# Altium PCB Car_Circuitry.PcbDoc
Units mm, origin at the board's own origin, x right, y up, seen from the top; angles counter-clockwise.
Board outline 92.11 x 67.11 mm, 4 copper layers (Top Signal, GND Plane, PWR Plane, Bottom Signal), stack 1.541 mm thick; 56 components, 49 nets, 197 pads, 46 vias.
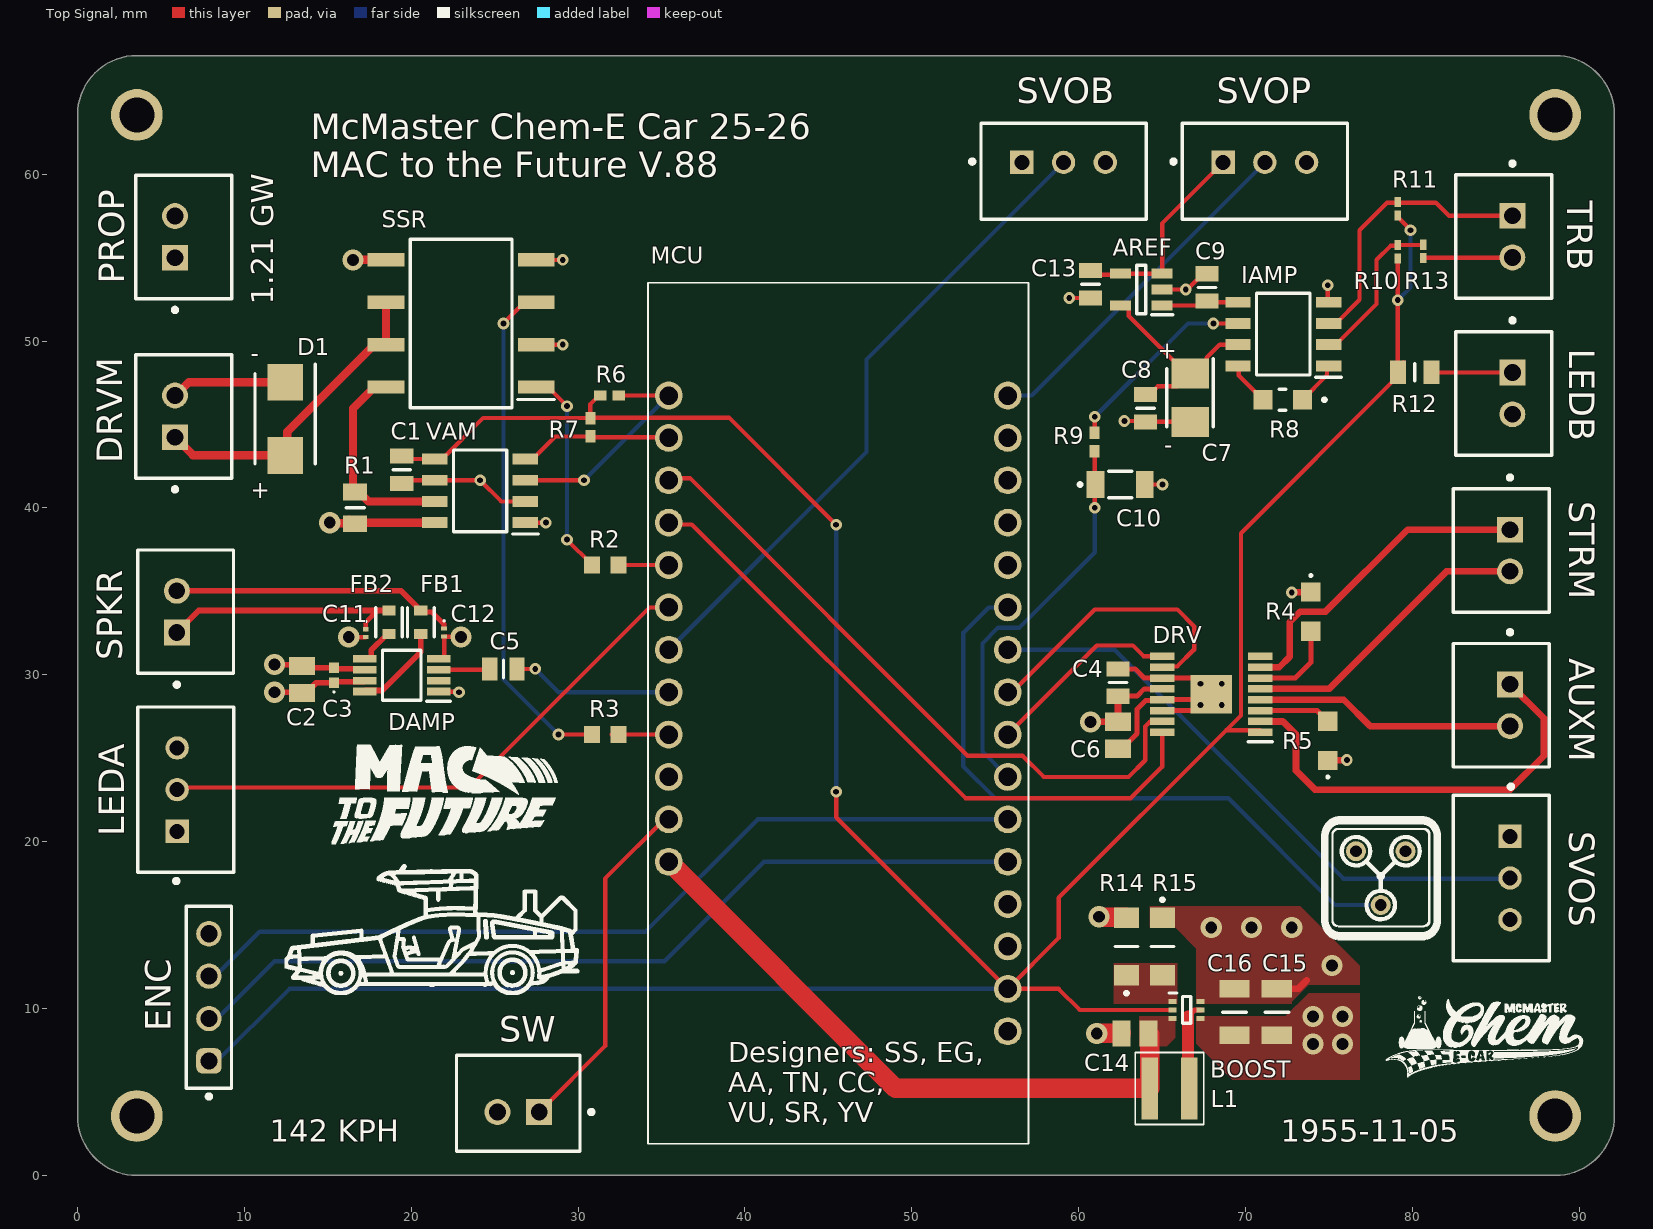
[diagram p0: Top Signal view]
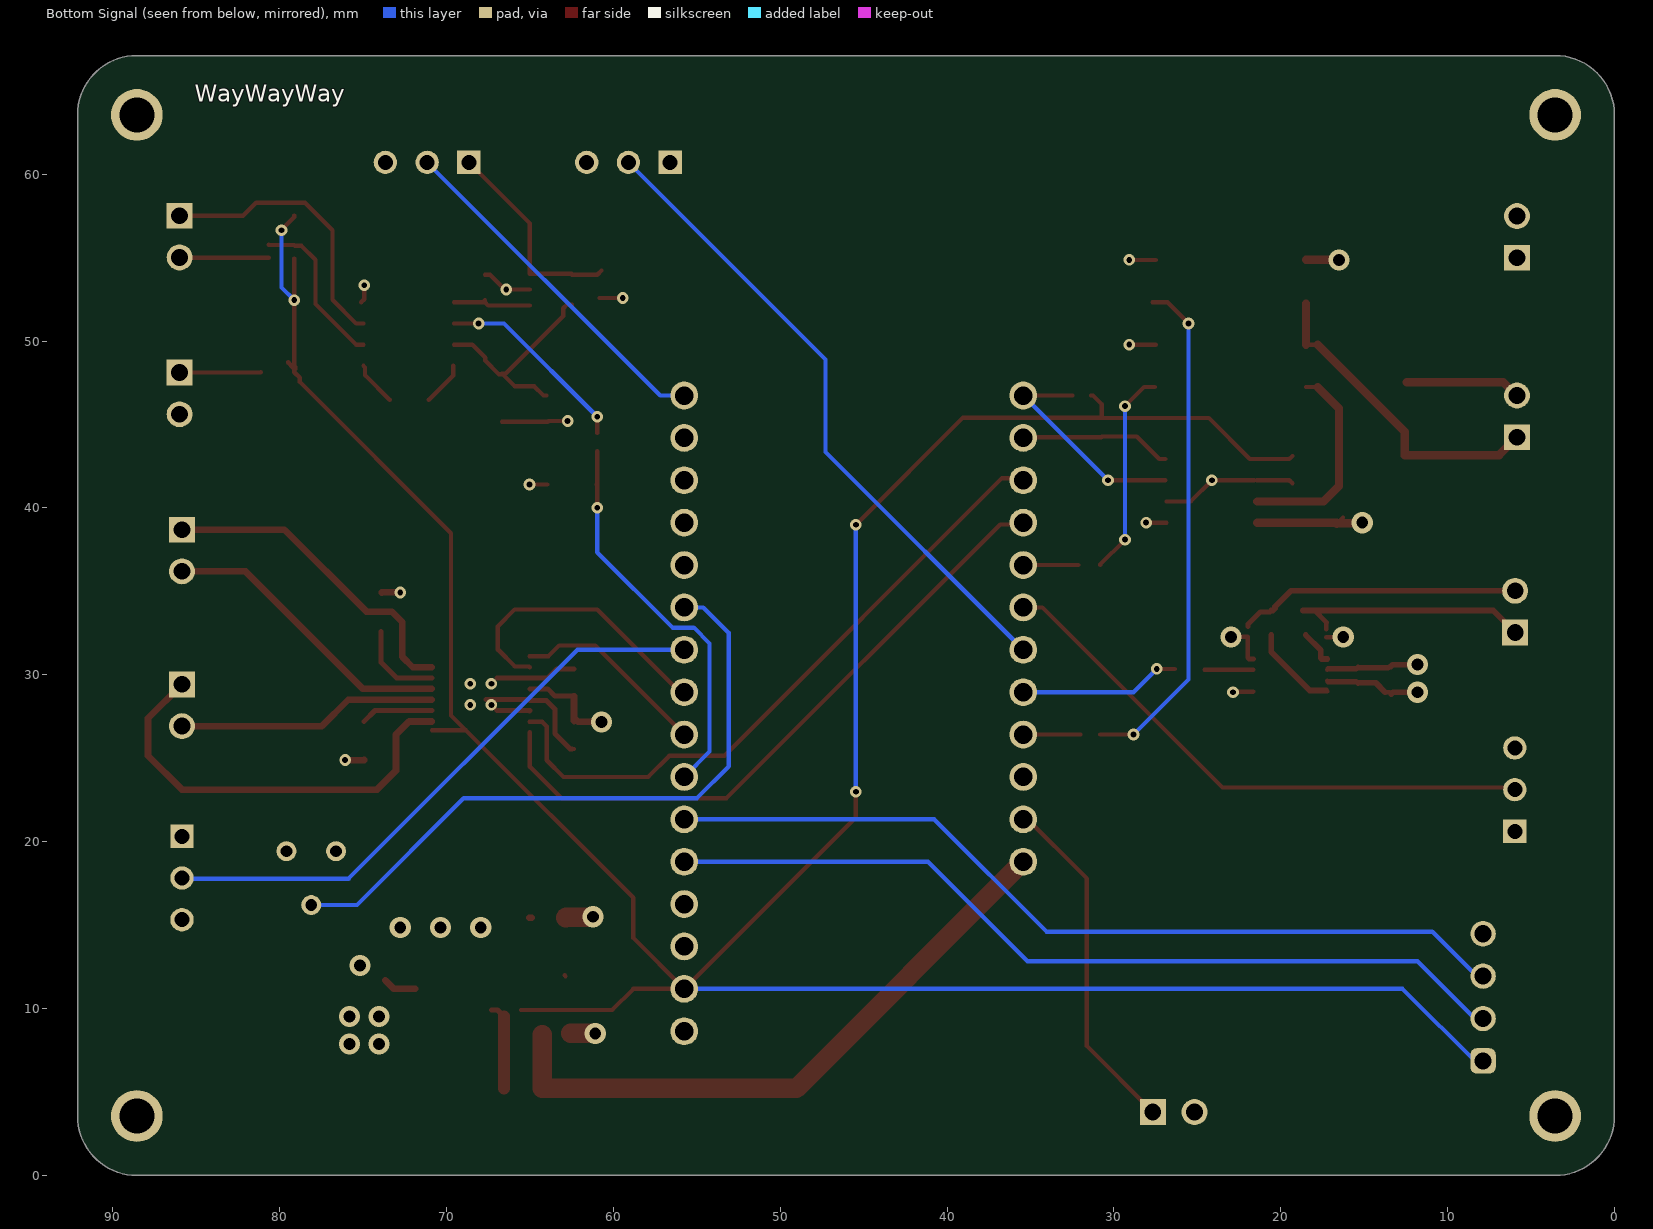
[diagram p1: Bottom Signal view, seen from below]
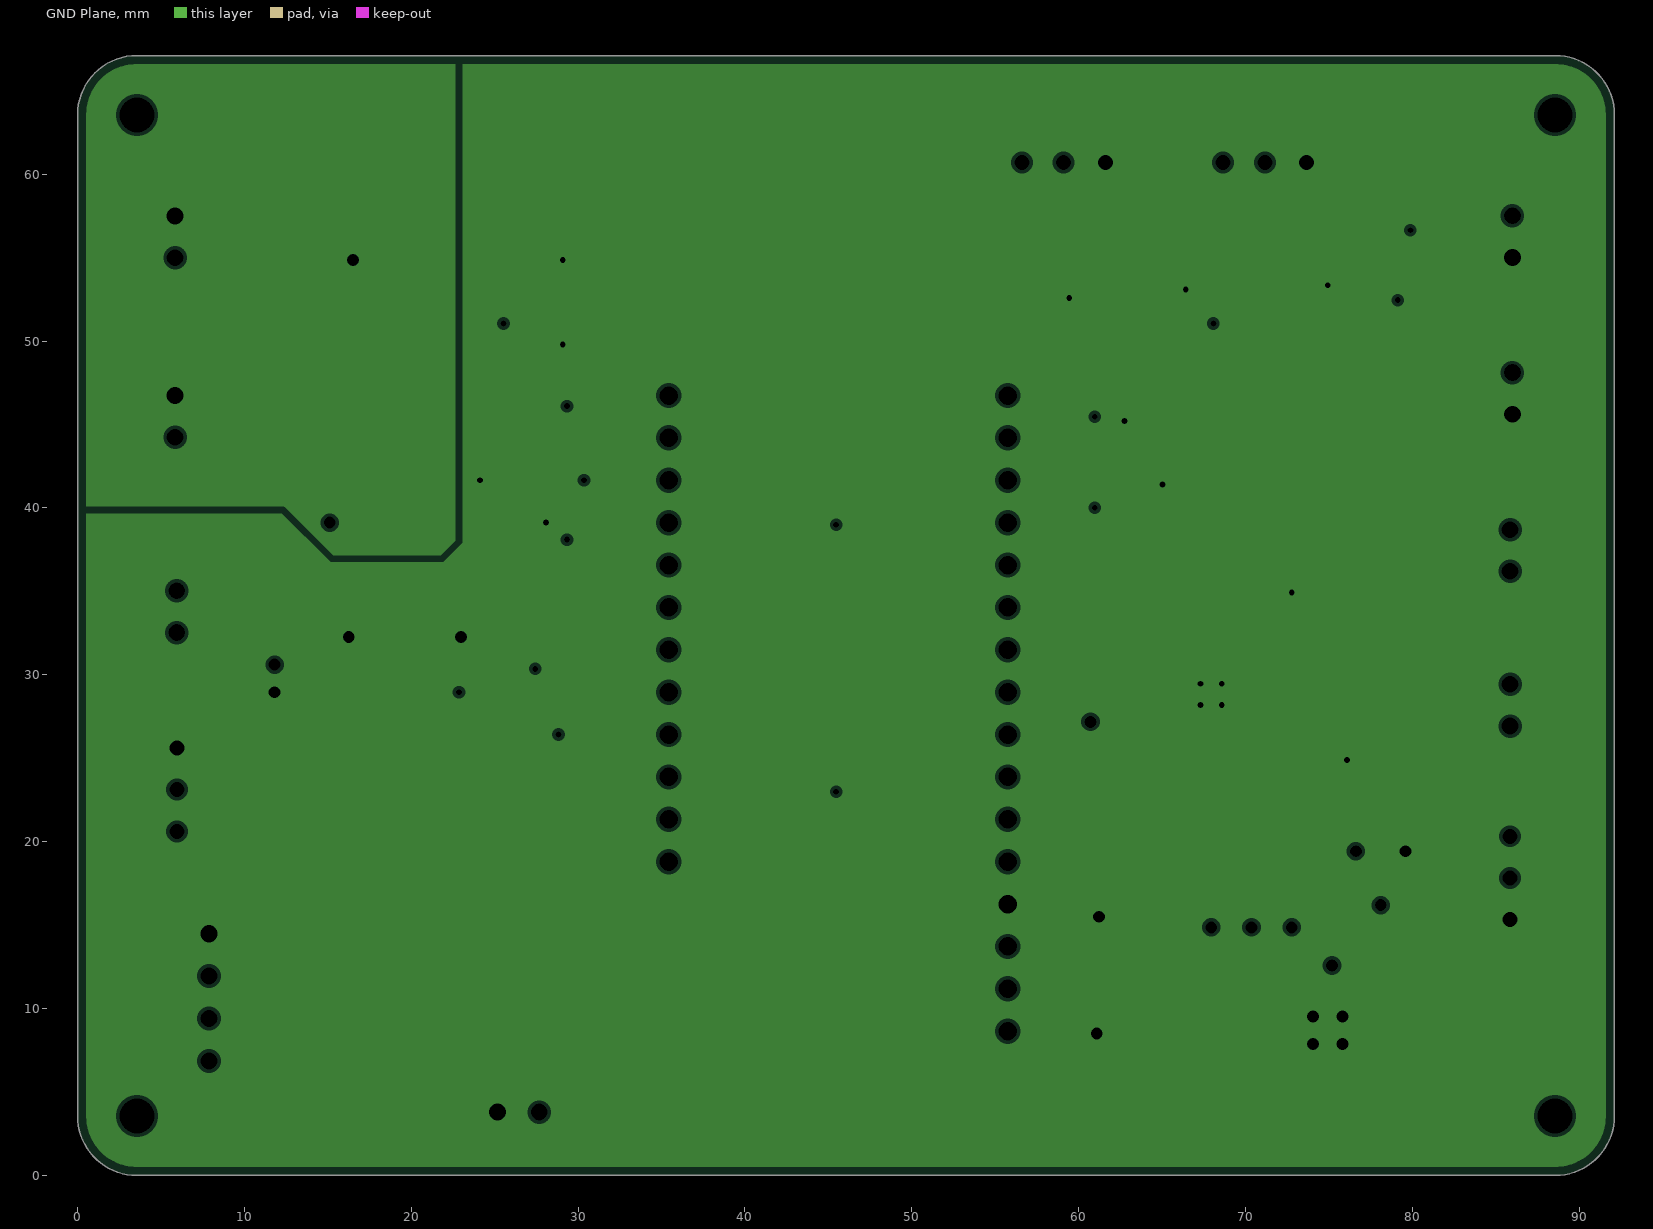
[diagram p2: GND Plane, clearances drawn from the general rule]
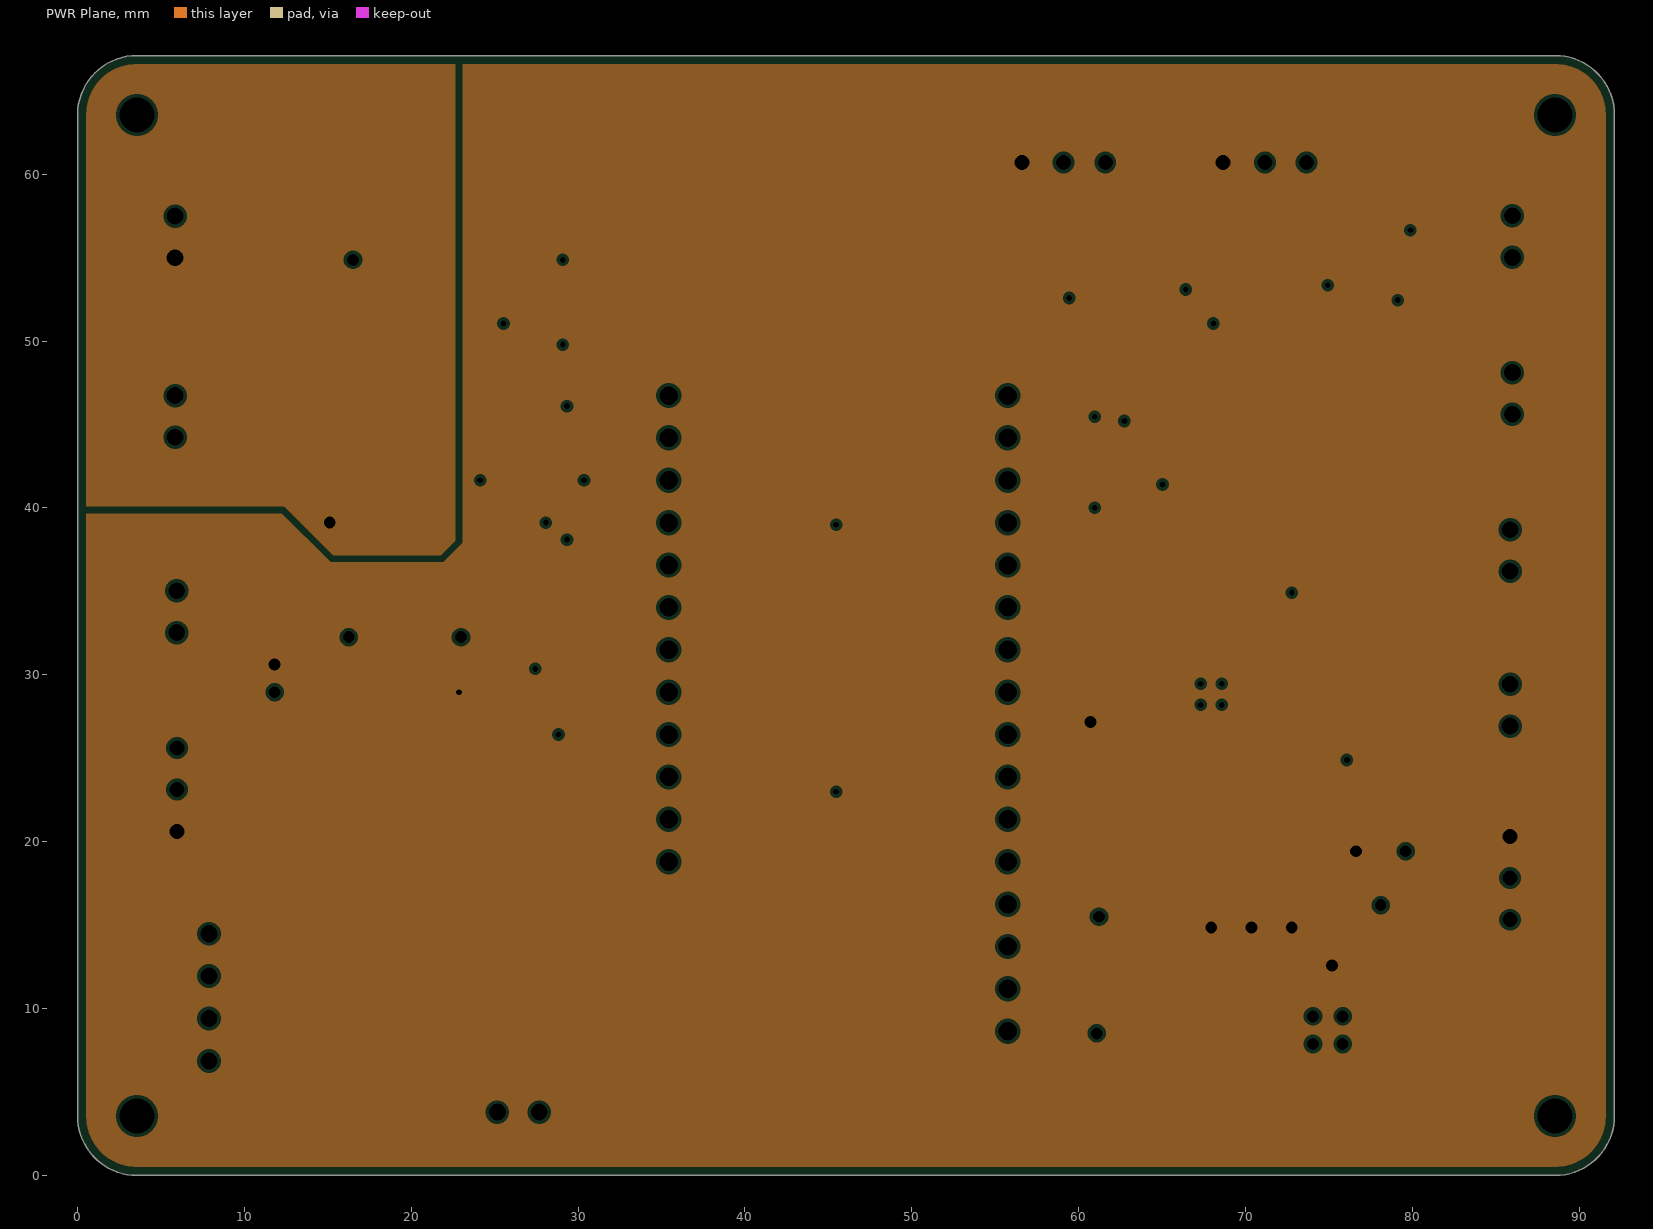
[diagram p3: PWR Plane, clearances drawn from the general rule]
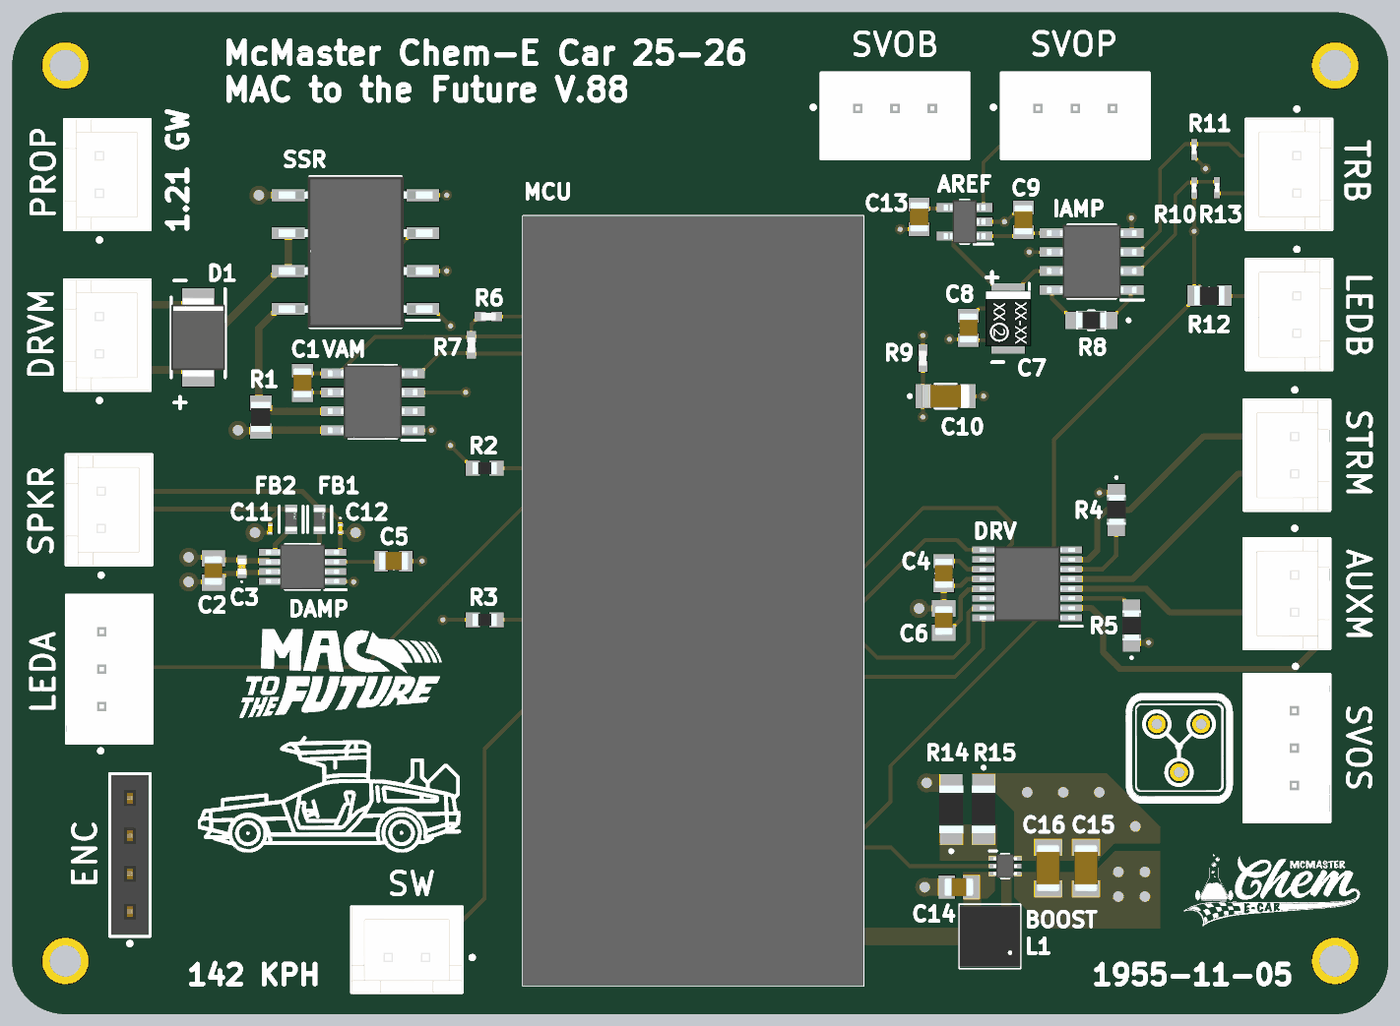
[diagram p4: 3D render of the assembled board from above, using the file's embedded part models]

## Layer stack, top to bottom
Top Solder: solder mask 0.0254, SM-002, Dk 4
Top Signal: signal copper 0.035
Dielectric 2: prepreg 0.1855, PP-021, Dk 4.74
GND Plane: plane copper 0.035, net (Multiple Nets)
Dielectric 1: core 1.03, Core-042, Dk 4.6
PWR Plane: plane copper 0.035, net (Multiple Nets)
Dielectric 3: prepreg 0.1855, PP-021, Dk 4.74
Bottom Signal: signal copper 0.035
Bottom Solder: solder mask 0.0254, SM-002, Dk 4

## Board outline
3.556,0 cw(c3.556,3.556) 0,3.556 0,63.556 cw(c3.556,63.556) 3.556,67.112 88.556,67.112 cw(c88.556,63.556) 92.112,63.556 92.112,3.556 cw(c88.556,3.556) 88.556,0

## Design rules (kind name [scope] priority, off if disabled: settings)
BoardOutlineClearance [All] p1: gap=0.2 ignorepadtopadclearanceinfootprint=FALSE
Clearance [All] p1: gap=0.102 ignorepadtopadclearanceinfootprint=TRUE except(0.127: Arc-Via Track-Via SMDPad-Via THPad-Via Via-Via Via-Fill Via-Poly Via-Region Via-Text; 0.254: Arc-Hole Track-Hole SMDPad-Hole THPad-Hole Via-Hole Fill-Hole Poly-Hole Region-Hole Text-Hole)
ComponentClearance [All] p1: gap=0.102 collisioncheckmode=3 verticalgap=0.102 showdistances=TRUE
DiffPairsRouting [All] p1: maxlimit=0.102 minlimit=0.102 mostfreqgap=0.102 toplayer_minwidth=0.102 toplayer_maxwidth=1816.048 toplayer_prefwidth=0.102 bottomlayer_minwidth=0.102 bottomlayer_maxwidth=1816.048 bottomlayer_prefwidth=0.102 maxuncoupledlength=12.7
Height [All] p1: minheight=0 maxheight=1816.048 prefheight=12.7
HoleSize [All] p1: absolutevalues=TRUE maxlimit=6.3 minlimit=0.2 maxpercent=80.000 minpercent=20.000
HoleToHoleClearance [All] p1: gap=0.254 allowstackedmicrovias=FALSE
MinimumAnnularRing [All] p1: minimumring=0.152
MinimumSolderMaskSliver [All] p1: minsoldermaskwidth=0.09
PlaneClearance [All] p1: clearance=0.204
PlaneConnect PlaneConnectPowerPads [InPadClass('PowerPads')] p1: planeconnectstyle=Direct reliefexpansion=0.508 reliefentries=4 reliefconductorwidth=0.254 reliefairgap=0.254
PlaneConnect [All] p2: pad.planeconnectstyle=Relief pad.reliefexpansion=0.3 pad.reliefentries=4 pad.reliefconductorwidth=0.204 pad.reliefairgap=0.204 via.planeconnectstyle=Direct via.reliefexpansion=0.3 via.reliefentries=4 via.reliefconductorwidth=0.127 via.reliefairgap=0.127
PolygonConnect PolygonConnectPowerPads [All vs (InPadClass('PowerPads'))] p1: connectstyle=Direct reliefconductorwidth=0.254 reliefentries=4 polygonreliefangle="90 Angle" airgapwidth=0.254
PolygonConnect [All] p2: thpad.connectstyle=Relief thpad.reliefconductorwidth=0.204 thpad.reliefentries=4 thpad.polygonreliefangle="90 Angle" thpad.airgapwidth=0.204 smdpad.connectstyle=Direct smdpad.reliefconductorwidth=0.102 smdpad.reliefentries=4 smdpad.polygonreliefangle="90 Angle" smdpad.airgapwidth=0.102 via.connectstyle=Direct via.reliefconductorwidth=0.127 via.reliefentries=4 via.polygonreliefangle="90 Angle" via.airgapwidth=0.127
RoutingVias [All] p1: holewidth=0.2 width=0.45 viastyle="Through Hole" minholewidth=0.2 minwidth=0.45 maxholewidth=6.3 maxwidth=6.55
SilkToSilkClearance [All] p1: silktosilkclearance=0.127
SilkToSolderMaskClearance [IsPad] p1: minsilkscreentomaskgap=0.127 clearancetoexposedcopper=TRUE
SolderMaskExpansion [All] p1: expansion=0.051 istentingtop=FALSE
SupplyNets "Schematic Supply Nets" [InNet('GND')] p1: voltage=0.000
UnRoutedNet [All] p1: checkbadconnections=TRUE
Width Width_4mil [All] p1: maxlimit=25.4 minlimit=0.102 preferedwidth=0.254 minimp=50.000000 maximp=50.000000 favimp=50.000000
19 further rules are at their usual default settings.

## Components (designator, comment, footprint, x,y, rotation, side; value= is the part's Value field where it differs from the comment)
AREF "REF2033QDDCRQ1" SOT95P280X110-5N 63.754,53.086 r180 top
AUXM "B2B-XH-A(LF)(SN)" FP-B2B-XH-A_LF_SN-MFG 85.327,28.174 r270 top
BOOST "TPS61023DRLT" SOTFL50P160X60-6N 66.472,9.914 r0 top
C1 "100 nF" CAPC2012X95N 19.431,42.291 r270 top
C2 "10 μF" CAPC2012X140N 13.462,29.718 r90 top
C3 "1 μF" C0402C104J4RACTU 15.367,29.972 r90 top
C4 "100 nF" CAPC2012X95N 62.357,29.533 r270 top
C5 "100 nF" CAPC2012X95N 25.527,30.353 r180 top
C6 "10 μF" CAPC2012X140N 62.357,26.368 r270 top
C7 "10 μF" CAPPM3528X210N 66.675,46.609 r270 top
C8 "100 nF" CAPC2012X95N 64.008,45.974 r270 top
C9 "100 nF" CAPC2012X95N 67.691,53.213 r90 top
C10 "100 μF" GRM31x 62.484,41.402 r0 top
C11 "220 pF" GRM033D70J224ME01D 17.272,32.495 r270 top
C12 "220 pF" GRM033D70J224ME01D 21.971,32.529 r270 top
C13 "100 nF" CAPC2012X95N 60.706,53.409 r270 top
C14 "10 μF" CAPC2012X140N 63.373,8.509 r0 top
C15 "22 μF" CAPC3216X180N 71.882,9.779 r90 top
C16 "22 μF" CAPC3216X180N 69.342,9.779 r90 top
D1 "SMBJ18CA" DIOM5436X261N 12.446,45.339 r270 top
DAMP "PAM8302AASCR" SOP65P490X110-8N 19.431,29.972 r180 top
DRV "DRV8847PWPR" SOP65P640X120-17N 67.945,28.829 r180 top
DRVM "B2B-XH-A(LF)(SN)" FP-B2B-XH-A_LF_SN-MFG 6.367,45.486 r90 top
ENC "61300411821" 61300411821 7.874,10.668 r90 top
FB1 "MPZ1608S221ATA00" FP-MPZ1608-0_8-MFG 20.574,33.147 r90 top
FB2 "MPZ1608S221ATA00" FP-MPZ1608-0_8-MFG 18.669,33.147 r90 top
IAMP "AD623ARZ-R7" SOIC127P600X175-8N 72.263,50.419 r180 top
L1 "1 μH" 74438357010 65.447,5.207 r180 top
LEDA "B3B-XH-A(LF)(SN)" FP-B3B-XH-A_LF_SN-MFG 6.494,23.114 r90 top
LEDB "B2B-XH-A(LF)(SN)" FP-B2B-XH-A_LF_SN-MFG 85.471,46.863 r270 top
MCU "Feather RP2040 Adalogger" 2796 55.753,8.636 r90 top
PROP "B2B-XH-A(LF)(SN)" FP-B2B-XH-A_LF_SN-MFG 6.367,56.241 r90 top
R1 "100 mΩ" RESC2013X65N 16.637,40.005 r90 top
R2 "400 Ω" RESC1608X46N 31.623,36.576 r180 top
R3 "400 Ω" RESC1608X46N 31.623,26.416 r180 top
R4 "680 mΩ" ERJ6_B_BW_R_LW_CW_D 73.914,33.782 r270 top
R5 "680 mΩ" ERJ6_B_BW_R_LW_CW_D 74.93,26.035 r90 top
R6 "10 kΩ" RESC1005X40N 31.877,46.736 r0 top
R7 "10 kΩ" RESC1005X40N 30.734,44.831 r270 top
R8 "200 kΩ" ERA6AEB101V 72.231,46.482 r180 top
R9 "330 Ω" RESC1005X40N 60.96,43.942 r270 top
R10 "5 kΩ" RESC0603X26N 79.121,55.353 r270 top
R11 "5 kΩ" RESC0603X26N 79.121,57.931 r270 top
R12 "150 Ω" RESC2012X60N 80.137,48.133 r180 top
R13 "5 kΩ" RESC0603X26N 80.645,55.372 r90 top
R14 "100 kΩ" ERJ8ENF1000V 62.865,13.716 r90 top
R15 "732 kΩ" ERJ8ENF1000V 65.024,13.716 r270 top
SPKR "B2B-XH-A(LF)(SN)" FP-B2B-XH-A_LF_SN-MFG 6.477,33.782 r90 top
SSR "CS326" SOP254P1030X390-8N 22.987,51.054 r180 top
STRM "B2B-XH-A(LF)(SN)" FP-B2B-XH-A_LF_SN-MFG 85.327,37.445 r270 top
SVOB "B3B-XH-A(LF)(SN)" FP-B3B-XH-A_LF_SN-MFG 59.095,60.181 r0 top
SVOP "B3B-XH-A(LF)(SN)" FP-B3B-XH-A_LF_SN-MFG 71.16,60.181 r0 top
SVOS "B3B-XH-A(LF)(SN)" FP-B3B-XH-A_LF_SN-MFG 85.327,17.82 r270 top
SW "B2B-XH-A(LF)(SN)" FP-B2B-XH-A_LF_SN-MFG 26.416,4.318 r180 top
TRB "B2B-XH-A(LF)(SN)" FP-B2B-XH-A_LF_SN-MFG 85.471,56.261 r270 top
VAM "INA219BIDR" SOIC127P600X175-8N 24.13,41.021 r180 top

## Footprints (in the part's own frame and the unit in brackets; to place one, negate y for a bottom-side part, rotate by r counter-clockwise, add the part's x,y. Pads: shape width x height; smd on the part's side, far side on the other; paste and mask are expansions set on the pad)
2796 [mm]
  round 1.665 hole 1.11: 1(10.16,20.32) 2(12.7,20.32) 3(15.24,20.32) 4(17.78,20.32) 5(20.32,20.32) 6(22.86,20.32) 7(25.4,20.32) 8(27.94,20.32) 9(30.48,20.32) 10(33.02,20.32) 11(35.56,20.32) 12(38.1,20.32) 13(38.1,0) 14(35.56,0) 15(33.02,0) 16(30.48,0) 17(27.94,0) 18(25.4,0) 19(22.86,0) 20(20.32,0) 21(17.78,0) 22(15.24,0) 23(12.7,0) 24(10.16,0) 25(7.62,0) 26(5.08,0) 27(2.54,0) 28(0,0)
  silkscreen extent -6.75,-1.24 44.85,21.56, body extent -6.75,-1.24 44.85,21.56, height 8.1
61300411821 [mm] "Socket Header, Pitch 2.54 mm, THT, Vertical, single row, 4p"
  rrect50% 1.52x1.52 hole 1.02: 1(-3.81,0)
  round 1.52 hole 1.02: 2(-1.27,0) 3(1.27,0) 4(3.81,0)
  silkscreen extent -6.06,-1.35 5.46,1.35, body extent -5.33,-1.25 5.33,1.25, height 8.55
74438357010 [mm]
  rect 0.98x3.7 smd: 1(-1.185,0) 2(1.185,0)
  silkscreen extent -2.05,-2.16 2.05,2.16, body extent -2.05,-2.05 2.05,2.05, height 3.1
C0402C104J4RACTU [mm]
  rect 0.62x0.62 smd: 1(-0.45,0) 2(0.45,0)
  silkscreen extent -1.05,-0.05 -0.95,0.05, body extent -0.52,-0.28 0.53,0.27, height 0.55
CAPC2012X95N [mm]
  rect 0.91x1.39 smd: 1(-0.82,0) 2(0.82,0)
  silkscreen extent 0,-0.53 0,0.53, body extent -1,-0.63 1,0.63, height 0.95
CAPC2012X140N [mm]
  rect 1.1x1.57 smd: 1(-0.81,0) 2(0.81,0)
  body extent -1,-0.63 1,0.63, height 1.4
CAPC3216X180N [mm]
  rect 1.05x1.82 smd: 1(-1.39,0) 2(1.39,0)
  silkscreen extent 0,-0.7 0,0.7, body extent -1.6,-0.8 1.6,0.8, height 1.8
CAPPM3528X210N [mm]
  rect 1.8x2.25 smd: 1(-1.45,0) 2(1.45,0)
  silkscreen extent -2.35,-1.4 1.75,1.4, body extent -1.86,-1.54 1.87,1.53, height 2.13
DIOM5436X261N [mm]
  rect 2.2x2.15 smd: 1(-2.2,0) 2(2.2,0)
  silkscreen extent -3.27,-1.81 2.7,1.81, body extent -2.7,-1.81 2.7,1.81, height 2.61
ERA6AEB101V [mm]
  rect 1.15x1.15 smd: 1(-1.175,0) 2(1.175,0)
  silkscreen extent -2.6,-0.63 0.2,0.63, body extent -1,-0.63 1,0.63, height 0.5
ERJ6_B_BW_R_LW_CW_D [mm]
  rect 1.15x1.15 smd: 1(-1.175,0) 2(1.175,0)
  silkscreen extent -2.21,-0.05 -2.11,0.05, body extent -1,-0.63 1,0.63, height 0.6
ERJ8ENF1000V [mm]
  rect 1.25x1.5 smd: 1(-1.725,0) 2(1.725,0)
  silkscreen extent -2.9,-0.67 0,0.67, body extent -1.6,-0.8 1.6,0.8, height 0.6
FP-B2B-XH-A_LF_SN-MFG [mm]
  rect 1.55x1.55 hole 1 paste-2539.97 mask+0: 1(-1.25,0.525)
  round 1.55 hole 1 paste-2539.97 mask+0: 2(1.25,0.525)
  silkscreen extent -4.5,-2.87 3.7,2.88, body extent -3.8,-2.98 3.8,2.98, height 0.25
FP-B3B-XH-A_LF_SN-MFG [mm]
  rect 1.4x1.4 hole 0.9 paste-2539.97 mask+0: 1(-2.5,0.525)
  round 1.4 hole 0.9 paste-2539.97 mask+0: 2(0,0.525) 3(2.5,0.525)
  silkscreen extent -5.6,-2.88 4.95,2.88, body extent -5.05,-2.98 5.05,2.98, height 0.25
FP-MPZ1608-0_8-MFG [mm]
  rect 0.6x0.8 smd paste+0 mask+0: 1(-0.7,0) 2(0.7,0)
  silkscreen extent -0.87,-0.8 0.87,0.8, body extent -1.1,-0.58 1.1,0.58, height 0.25
GRM31x [mm]
  rect 1.05x1.6 smd: 1(-1.475,0) 2(1.475,0)
  silkscreen extent -2.5,-0.8 0.7,0.8, body extent -1.6,-0.8 1.6,0.8, height 1
GRM033D70J224ME01D [mm]
  rect 0.25x0.35 smd: 1(-0.237,0) 2(0.237,0)
  silkscreen extent -0.75,-0.05 -0.65,0.05, body extent -0.3,-0.15 0.3,0.15, height 0.3
RESC0603X26N [mm]
  rect 0.6x0.4 smd: 1(-0.4,0) 2(0.4,0)
  body extent -0.31,-0.15 0.31,0.15, height 0.26
RESC1005X40N [mm]
  rect 0.75x0.6 smd: 1(-0.55,0) 2(0.55,0)
  body extent -0.5,-0.25 0.5,0.25, height 0.35
RESC1608X46N [mm]
  rect 0.95x1 smd: 1(-0.8,0) 2(0.8,0)
  body extent -0.81,-0.41 0.81,0.41, height 0.46
RESC2012X60N [mm]
  rect 0.95x1.4 smd: 1(-1,0) 2(1,0)
  silkscreen extent 0,-0.53 0,0.53, body extent -1,-0.63 1,0.63, height 0.6
RESC2013X65N [mm]
  rect 1x1.45 smd: 1(-0.95,0) 2(0.95,0)
  silkscreen extent 0,-0.55 0,0.55, body extent -1,-0.65 1,0.65, height 0.65
SOIC127P600X175-8N [mm]
  rect 1.525x0.65 smd: 1(-2.712,1.905) 2(-2.712,0.635) 3(-2.712,-0.635) 4(-2.712,-1.905) 5(2.712,-1.905) 6(2.712,-0.635) 7(2.712,0.635) 8(2.712,1.905)
  silkscreen extent -3.47,-2.45 1.6,2.58, body extent -3,-2.45 3,2.45, height 1.75
SOP65P490X110-8N [mm]
  rect 1.425x0.45 smd: 1(-2.212,0.975) 2(-2.212,0.325) 3(-2.212,-0.325) 4(-2.212,-0.975) 5(2.212,-0.975) 6(2.212,-0.325) 7(2.212,0.325) 8(2.212,0.975)
  silkscreen extent -2.93,-1.5 1.15,1.55, body extent -2.45,-1.5 2.45,1.5, height 1.1
SOP65P640X120-17N [mm]
  rect 1.475x0.45 smd: 1(-2.938,2.275) 2(-2.938,1.625) 3(-2.938,0.975) 4(-2.938,0.325) 5(-2.938,-0.325) 6(-2.938,-0.975) 7(-2.938,-1.625) 8(-2.938,-2.275) 9(2.938,-2.275) 10(2.938,-1.625) 11(2.938,-0.975) 12(2.938,-0.325) 13(2.938,0.325) 14(2.938,0.975) 15(2.938,1.625) 16(2.938,2.275)
  rect 2.46x2.31 smd: 17(0,0)
  silkscreen extent -3.67,2.85 -2.2,2.85, body extent -3.2,-2.5 3.2,2.5, height 1.2
SOP254P1030X390-8N [mm]
  rect 2.2x0.8 smd: 1(-4.5,3.81) 2(-4.5,1.27) 3(-4.5,-1.27) 4(-4.5,-3.81) 5(4.5,-3.81) 6(4.5,-1.27) 7(4.5,1.27) 8(4.5,3.81)
  silkscreen extent -5.6,-5.05 3.05,5.05, body extent -5.15,-5.05 5.15,5.05, height 3.9
SOT95P280X110-5N [mm]
  rect 1.25x0.6 smd: 1(-1.25,0.95) 2(-1.25,0) 3(-1.25,-0.95) 4(1.25,-0.95) 5(1.25,0.95)
  silkscreen extent -1.88,-1.45 0.28,1.5, body extent -1.4,-1.45 1.4,1.45, height 1.1
SOTFL50P160X60-6N [mm]
  rect 0.475x0.3 smd: 1(-0.838,0.5) 2(-0.838,0) 3(-0.838,-0.5) 4(0.838,-0.5) 5(0.838,0) 6(0.838,0.5)
  silkscreen extent -1.06,-0.8 0.25,1.02, body extent -0.8,-0.8 0.8,0.8, height 0.6

## Part data
AREF: "Integrated Circuit", Manufacturer_Name="Texas Instruments", Mouser Part Number=595-REF2033QDDCRQ1, Arrow Part Number=REF2033QDDCRQ1, Arrow Price/Stock=https://www.arrow.com/en/products/ref2033qddcrq1/texas-instruments?utm_currency=USD&region=nac, Datasheet Link=https://www.arrow.com/en/products/ref2033qddcrq1/texas-instruments?region=nac, Height=1.1mm, Manufacturer_Part_Number=REF2033QDDCRQ1, Mouser Price/Stock=https://www.mouser.co.uk/ProductDetail/Texas-Instruments/REF2033QDDCRQ1?qs=rSMjJ%252B1ewcT9jXmIxG%2FW%2Fg%3D%3D
AUXM DRVM LEDB PROP SPKR STRM SW TRB: library part CMP-2000-05888-3, "CONN HEADER VERT 2POS 2.5MM", Color=Natural, Contact Resistance=20mR, Current Rating=3A, Housing Color=White, Insulation Resistance=1GR, Max Operating Temperature=85°C, Max Voltage Rating (AC)=250V, Min Operating Temperature=-25°C, Connector Type="Male Pin", Contact Material=Brass, Contact Plating=Tin, Contact Type="Male Pin", Depth=5.75mm, Fastening Type=Detent, Housing Material=Polyamide, Lead Free="Lead Free", Lead Pitch=2.5mm, Length=7.4mm, Max Current Rating=3A, Max Voltage Rating (DC)=250V, Mount="Through Hole", Number of Contacts=2, Number of Positions=2, Number of Rows=1, Orientation=Straight, Packaging=Bulk, Pitch=2.5mm, REACH SVHC="No SVHC", Series=XH, Termination=Solder, Voltage Rating=250V, Voltage Rating (AC)=250V, Wire/Cable Gauge=22AWG
BOOST: "Integrated Circuit", Manufacturer_Name="Texas Instruments", Mouser Part Number=595-TPS61023DRLT, Arrow Part Number=TPS61023DRLT, Arrow Price/Stock=https://www.arrow.com/en/products/tps61023drlt/texas-instruments?region=nac, Datasheet Link=http://www.ti.com/general/docs/suppproductinfo.tsp?distId=10&gotoUrl=http%3A%2F%2Fwww.ti.com%2Flit%2Fgpn%2Ftps61023, Height=0.6mm, Manufacturer_Part_Number=TPS61023DRLT, Mouser Price/Stock=https://www.mouser.co.uk/ProductDetail/Texas-Instruments/TPS61023DRLT?qs=BJlw7L4Cy78Zr3IJIU3gNw%3D%3D
C1 C4 C5 C8 C9 C13: library part CL21B104KBCNNNC, "Capacitor", Manufacturer_Name=SAMSUNG, Mouser Part Number=187-CL21B104KBCNNNC, Arrow Part Number=CL21B104KBCNNNC, Arrow Price/Stock=https://www.arrow.com/en/products/cl21b104kbcnnnc/samsung-electro-mechanics?region=europe, Datasheet Link=https://datasheet.datasheetarchive.com/originals/distributors/Datasheets_SAMA/86a3eaf0882763ef32124d5901f9b833.pdf, Height=0.95mm, Manufacturer_Part_Number=CL21B104KBCNNNC, Mouser Price/Stock=https://www.mouser.co.uk/ProductDetail/Samsung-Electro-Mechanics/CL21B104KBCNNNC?qs=349EhDEZ59pEfpnm5yBEmQ%3D%3D
C2 C6 C14: library part CL21B106KOQNNNE, "Capacitor", Manufacturer_Name=SAMSUNG, Mouser Part Number=187-CL21B106KOQNNNE, Arrow Part Number=CL21B106KOQNNNE, Arrow Price/Stock=https://www.arrow.com/en/products/cl21b106koqnnne/samsung-electro-mechanics, Datasheet Link=https://datasheet.datasheetarchive.com/originals/distributors/Datasheets_SAMA/a6a503886ec2e900bbf4e5d6e2f8e8b0.pdf, Height=1.4mm, Manufacturer_Part_Number=CL21B106KOQNNNE, Mouser Price/Stock=https://www.mouser.co.uk/ProductDetail/Samsung-Electro-Mechanics/CL21B106KOQNNNE?qs=349EhDEZ59r8qgLddyW2Yw%3D%3D
C3: library part C0402C105K9PACTU, "Capacitor", Manufacturer_Name=KEMET, Mouser Part Number=80-C0402C105K9P, Arrow Part Number=C0402C105K9PACTU, Arrow Price/Stock=https://www.arrow.com/en/products/c0402c105k9pactu/kemet-corporation?region=nac, Datasheet Link=https://content.kemet.com/datasheets/KEM_C1002_X7R_SMD.pdf, Height=0.55mm, Manufacturer_Part_Number=C0402C105K9PACTU, Mouser Price/Stock=https://www.mouser.co.uk/ProductDetail/KEMET/C0402C105K9PACTU?qs=UdQET6xYxVCMExqTDkuPeQ%3D%3D
C7: library part 293D106X9016B2TE3, "Capacitor Polarised", Manufacturer_Name=Vishay, Mouser Part Number=74-293D106X9016B2TE3, Arrow Part Number=293D106X9016B2TE3, Arrow Price/Stock=https://www.arrow.com/en/products/293d106x9016b2te3/vishay?region=nac, Datasheet Link=http://www.vishay.com/docs/40002/293d.pdf, Height=2.1mm, Manufacturer_Part_Number=293D106X9016B2TE3, Mouser Price/Stock=https://www.mouser.co.uk/ProductDetail/Vishay-Sprague/293D106X9016B2TE3?qs=wgO0AD0o1vsITAGguIIpRA%3D%3D
C10: library part GRM31CD80J107MEA8K, "Capacitor", Manufacturer_Name="Murata Electronics", Mouser Part Number=81-GRM31CD80J107MA8K, Datasheet Link=https://search.murata.co.jp/Ceramy/image/img/A01X/G101/ENG/GRM31CD80J107MEA8-01A.pdf, Height=1.25mm, Manufacturer_Part_Number=GRM31CD80J107MEA8K, Mouser Price/Stock=https://www.mouser.co.uk/ProductDetail/Murata-Electronics/GRM31CD80J107MEA8K?qs=hd1VzrDQEGjqZLplFGf8IQ%3D%3D
C11 C12: library part GRM033R71C221KA01D, "Capacitor", Manufacturer_Name="Murata Electronics", Mouser Part Number=81-GRM033R71C221KA1D, Datasheet Link=https://search.murata.co.jp/Ceramy/image/img/A01X/G101/ENG/GRM033R71C221KA01-01A.pdf, Height=0.33mm, Manufacturer_Part_Number=GRM033R71C221KA01D, Mouser Price/Stock=https://www.mouser.com/Search/Refine.aspx?Keyword=81-GRM033R71C221KA1D
C15 C16: library part CL31B226KPHNNNE, "Capacitor", Manufacturer_Name=SAMSUNG, Mouser Part Number=187-CL31B226KPHNNNE, Arrow Part Number=CL31B226KPHNNNE, Arrow Price/Stock=https://www.arrow.com/en/products/cl31b226kphnnne/samsung-electro-mechanics?region=nac, Datasheet Link=https://media.digikey.com/pdf/Data%20Sheets/Samsung%20PDFs/CL_Series_MLCC_ds.pdf, Height=1.8mm, Manufacturer_Part_Number=CL31B226KPHNNNE, Mouser Price/Stock=https://www.mouser.co.uk/ProductDetail/Samsung-Electro-Mechanics/CL31B226KPHNNNE?qs=EHbfJsBkB6nWZLDFWYPW4w%3D%3D
D1: "TVS Diode (Bi-directional)", Manufacturer_Name=LITTELFUSE, Mouser Part Number=576-SMBJ18CA, Arrow Part Number=SMBJ18CA, Arrow Price/Stock=https://www.arrow.com/en/products/smbj18ca/littelfuse?utm_currency=USD&region=nac, Datasheet Link=http://www.littelfuse.com/~/media/electronics/datasheets/tvs_diodes/littelfuse_tvs_diode_smbj_datasheet.pdf.pdf, Height=2.61mm, Manufacturer_Part_Number=SMBJ18CA, Mouser Price/Stock=https://www.mouser.co.uk/ProductDetail/Littelfuse/SMBJ18CA?qs=HR2RnyOI4E5LXIGVih8ojg%3D%3D
DAMP: "Integrated Circuit", Manufacturer_Name="Diodes Incorporated", Mouser Part Number=621-PAM8302AASCR, Arrow Part Number=PAM8302AASCR, Arrow Price/Stock=https://www.arrow.com/en/products/pam8302aascr/diodes-incorporated?utm_currency=USD&region=nac, Datasheet Link=https://www.diodes.com/assets/Datasheets/PAM8302A.pdf, Height=1.1mm, Manufacturer_Part_Number=PAM8302AASCR, Mouser Price/Stock=https://www.mouser.co.uk/ProductDetail/Diodes-Incorporated/PAM8302AASCR?qs=pYVYkI7xuRXTVZEQSGcDyg%3D%3D
DRV: "Integrated Circuit", Manufacturer_Name="Texas Instruments", Mouser Part Number=595-DRV8847PWPR, Arrow Part Number=DRV8847PWPR, Arrow Price/Stock=https://www.arrow.com/en/products/drv8847pwpr/texas-instruments, Datasheet Link=http://www.ti.com/general/docs/lit/getliterature.tsp?genericPartNumber=DRV8847&fileType=pdf&HQS=ti-null-null-sf-df-pf-sep-wwe&DCM=yes, Height=1.2mm, Manufacturer_Part_Number=DRV8847PWPR, Mouser Price/Stock=https://www.mouser.co.uk/ProductDetail/Texas-Instruments/DRV8847PWPR?qs=w%2Fv1CP2dgqrvdo8J8mfnIQ%3D%3D
ENC: library part CMP-1502-01316-4, "THT Vertical Socket Header WR-PHD, Pitch 2.54 mm, Single Row, 4 pins", Contact Resistance=20mΩ, Current Rating=3A, Operating Supply Voltage=250V, Gender=Female, Lead Pitch=2.54mm, Number of Pins=4, Orientation=Vertical
FB1 FB2: library part CMP-08257-000028-1, "Power line Ferrite Bead 220Ω @ 100MHz 2.2A DCR 0.05Ω SMD 0603", Case Code (Imperial)=0603, Case Code (Metric)=1608, Current Rating=2.2A, DC Resistance (DCR)=50mR, Package Quantity=1, Tolerance=25%, Case/Package=0603, Core Material=Ferrite, Height=0.037inch, Impedance=220R, Lead Free="Lead Free", Length=0.063inch, Max DC Current=2.2A, Mount="Surface Mount", Number of Pins=2, Packaging="Cut Tape", REACH SVHC="No SVHC", RoHS Compliant=Yes, Series=MPZ, Width=0.031inch
IAMP: library part AD623AR-REEL7, "Integrated Circuit", Manufacturer_Name="Analog Devices", Mouser Part Number=584-AD623AR-R7, Datasheet Link=https://componentsearchengine.com/Datasheets/1/AD623AR-REEL7.pdf, Height=1.75mm, Manufacturer_Part_Number=AD623AR-REEL7, Mouser Price/Stock=http://www.mouser.com/Search/ProductDetail.aspx?qs=NmRFExCfTkEbmJR8gDz96w%3d%3d
L1: library part 74438357010, "Inductor", Manufacturer_Name="Wurth Elektronik", Mouser Part Number=710-74438357010, Datasheet Link=https://katalog.we-online.de/pbs/datasheet/74438357010.pdf, Height=3.1mm, Manufacturer_Part_Number=74438357010, Mouser Price/Stock=https://www.mouser.co.uk/ProductDetail/Wurth-Elektronik/74438357010?qs=AQlKX63v8RstGPuQmrueWg%3D%3D
LEDA SVOB SVOP SVOS: library part CMP-17439-000014-3, "CONN HEADER VERT 3POS 2.5MM", Color=Natural, Contact Resistance=20mR, Current Rating=3A, Flammability Rating="UL94 V-0", Housing Color=White, Insulation Resistance=1GR, Max Operating Temperature=85°C, Max Voltage Rating (AC)=250V, Min Operating Temperature=-25°C, Connector Type=Header, Contact Finish - Mating=TIN, Contact Material=Brass, Contact Plating=Tin, Contact Shape=Square, Contact Type="Male Pin", Depth=5.75mm, Fastening Type=Detent, Gender=Male, Housing Material=Polyamide, Insulation Color=Natural, Insulation Material=Nylon, Lead Free="Lead Free", Lead Pitch=2.5mm, Length=9.9mm, Max Current Rating=3A, Max Voltage Rating (DC)=250V, Mount="Through Hole", Number of Contacts=3, Number of Positions=3, Number of Rows=1, Orientation=Straight, Packaging=Bulk, Pitch=2.5mm, REACH SVHC="No SVHC", Series=XH, Termination=Solder, Voltage Rating=250V, Voltage Rating (AC)=250V, Wire/Cable Gauge=22AWG
MCU: library part 2796, "Adafruit Microcontroller", Arrow Part Number=4884, Manufacturer_Name=Adafruit, Mouser Part Number=485-5980, Arrow Price/Stock=https://www.arrow.com/en/products/4884/adafruit-industries, Datasheet Link=https://learn.adafruit.com/adafruit-feather-rp2040-adalogger/, Height=8mm, Manufacturer_Part_Number=4884, Mouser Price/Stock=https://www.mouser.com/ProductDetail/Adafruit/5980?qs=IKkN%2F947nfCnlS5PgbpnkA%3D%3D
R1: library part RCWE0805R100FKEA, "Resistor", Manufacturer_Name=Vishay, Mouser Part Number=71-RCWE0805R100FKEA, Datasheet Link=https://www.vishay.com/docs/20019/rcwe.pdf, Height=0.65mm, Manufacturer_Part_Number=RCWE0805R100FKEA, Mouser Price/Stock=https://www.mouser.co.uk/ProductDetail/Vishay-Dale/RCWE0805R100FKEA?qs=tL36CZ7EjgSyC2ZeY9Ik2g%3D%3D
R2 R3: library part PAT0603E4000BST1, "Resistor", Manufacturer_Name=Vishay, Mouser Part Number=71-PAT0603E4000BST1, Arrow Part Number=PAT0603E4000BST1, Arrow Price/Stock=https://www.arrow.com/en/products/pat0603e4000bst1/vishay, Datasheet Link=https://www.vishay.com/docs/60024/pat.pdf, Height=0.457mm, Manufacturer_Part_Number=PAT0603E4000BST1, Mouser Price/Stock=https://www.mouser.co.uk/ProductDetail/Vishay-Thin-Film/PAT0603E4000BST1?qs=Bakm8ERcljqViks9GK20nA%3D%3D
R4 R5: library part ERJ-6DQJR68V, "Resistor", Manufacturer_Name=Panasonic, Arrow Part Number=ERJ-6DQJR68V, Arrow Price/Stock=https://www.arrow.com/en/products/erj-6dqjr68v/panasonic, Datasheet Link=http://industrial.panasonic.com/cdbs/www-data/pdf/RDN0000/AOA0000C313.pdf, Manufacturer_Part_Number=ERJ-6DQJR68V
R6 R7: library part RC0402JR-0710KL, "Resistor", Manufacturer_Name=YAGEO, Mouser Part Number=603-RC0402JR-0710KL, Arrow Part Number=RC0402JR-0710KL, Arrow Price/Stock=https://www.arrow.com/en/products/rc0402jr-0710kl/yageo?utm_currency=USD&region=europe, Datasheet Link=https://www.yageo.com/upload/media/product/productsearch/datasheet/rchip/PYu-RC_Group_51_RoHS_L_12.pdf, Height=0.4mm, Manufacturer_Part_Number=RC0402JR-0710KL, Mouser Price/Stock=https://www.mouser.co.uk/ProductDetail/YAGEO/RC0402JR-0710KL?qs=V1yeUXFNrkk4BhFptVo0Rw%3D%3D
R8: library part ERA-6AEB204V, "Resistor", Manufacturer_Name=Panasonic, Mouser Part Number=667-ERA-6AEB204V, Arrow Part Number=ERA-6AEB204V, Arrow Price/Stock=https://www.arrow.com/en/products/era6aeb204v/panasonic, Datasheet Link=https://industrial.panasonic.com/cdbs/www-data/pdf/RDM0000/AOA0000C307.pdf, Height=0.6mm, Manufacturer_Part_Number=ERA-6AEB204V, Mouser Price/Stock=https://www.mouser.co.uk/ProductDetail/Panasonic/ERA-6AEB204V?qs=nho8PGNfA6pnUIygri3Lhw%3D%3D
R9: library part RC0402FR-07330RL, "Resistor", Manufacturer_Name=KEMET, Mouser Part Number=603-RC0402FR-07330RL, Arrow Part Number=RC0402FR-07330RL, Arrow Price/Stock=https://www.arrow.com/en/products/rc0402fr-07330rl/yageo, Datasheet Link=http://www.yageo.com/documents/recent/PYu-RC0402_51_RoHS_L_6_r.pdf, Height=0.4mm, Manufacturer_Part_Number=RC0402FR-07330RL, Mouser Price/Stock=https://www.mouser.co.uk/ProductDetail/Yageo/RC0402FR-07330RL?qs=V1yeUXFNrkngRWHRQxns%2Fg%3D%3D
R10 R11 R13: library part TNPW02015K00BEED, "Resistor", Manufacturer_Name=Vishay, Mouser Part Number=71-TNPW02015K00BEED, Arrow Part Number=TNPW02015K00BEED, Arrow Price/Stock=https://www.arrow.com/en/products/tnpw02015k00beed/vishay?utm_currency=USD&region=nac, Datasheet Link=https://www.vishay.com/docs/28758/tnpw_e3.pdf, Height=0.26mm, Manufacturer_Part_Number=TNPW02015K00BEED, Mouser Price/Stock=https://www.mouser.co.uk/ProductDetail/Vishay-Dale/TNPW02015K00BEED?qs=GBLSl2AkirvkqBgWZm4PiQ%3D%3D
R12: library part RK73B2ATTD151J, "Resistor", Manufacturer_Name="KOA Speer", Mouser Part Number=660-RK73B2ATTD151J, Arrow Part Number=RK73B2ATTD151J, Arrow Price/Stock=https://www.arrow.com/en/products/rk73b2attd151j/koa-speer-electronics?utm_currency=USD&region=nac, Datasheet Link=https://www.arrow.com/en/products/rk73b2attd151j/koa-speer-electronics, Height=0.6mm, Manufacturer_Part_Number=RK73B2ATTD151J, Mouser Price/Stock=https://www.mouser.co.uk/ProductDetail/KOA-Speer/RK73B2ATTD151J?qs=Eg3swSo9kV1ngoeZFqQs4w%3D%3D
R14: library part ERJ-8ENF1003V, "Resistor", Manufacturer_Name=Panasonic, Mouser Part Number=667-ERJ-8ENF1003V, Arrow Part Number=ERJ-8ENF1003V, Arrow Price/Stock=https://www.arrow.com/en/products/erj-8enf1003v/panasonic?region=nac, Datasheet Link=https://industrial.panasonic.com/cdbs/www-data/pdf/RDA0000/AOA0000C86.pdf, Height=0.7mm, Manufacturer_Part_Number=ERJ-8ENF1003V, Mouser Price/Stock=https://www.mouser.co.uk/ProductDetail/Panasonic/ERJ-8ENF1003V?qs=8%252BG0TiN%2FgVoayg2hl%252BJeeg%3D%3D
R15: library part ERJ-8ENF7323V, "Resistor", Manufacturer_Name=Panasonic, Mouser Part Number=667-ERJ-8ENF7323V, Datasheet Link=https://industrial.panasonic.com/cdbs/www-data/pdf/RDA0000/AOA0000C86.pdf, Height=0.7mm, Manufacturer_Part_Number=ERJ-8ENF7323V, Mouser Price/Stock=https://www.mouser.co.uk/ProductDetail/Panasonic/ERJ-8ENF7323V?qs=Ow%252BOiPmaljHJ6lt%2FbxwsiQ%3D%3D
SSR: "Relay or Contactor", Manufacturer_Name="Coto Technology", Mouser Part Number=816-CS326, Datasheet Link=https://componentsearchengine.com/Datasheets/1/CS326.pdf, Height=3.9mm, Manufacturer_Part_Number=CS326, Mouser Price/Stock=https://www.mouser.co.uk/ProductDetail/Coto-Technology/CS326?qs=Awm7IEb3pyEQ4ykqCGUh%252BA%3D%3D
VAM: "Integrated Circuit", Manufacturer_Name="Texas Instruments", Mouser Part Number=595-INA219BIDR, Arrow Part Number=INA219BIDR, Arrow Price/Stock=https://www.arrow.com/en/products/ina219bidr/texas-instruments?utm_currency=USD&region=nac, Datasheet Link=https://www.ti.com/lit/ds/symlink/ina219.pdf?HQS=TI-null-null-digikeymode-df-pf-null-wwe&ts=1601223553719, Height=1.75mm, Manufacturer_Part_Number=INA219BIDR, Mouser Price/Stock=https://www.mouser.co.uk/ProductDetail/Texas-Instruments/INA219BIDR?qs=1WmUhT%2FVMINyGsXNJcdD5Q%3D%3D

## Free pads (board coordinates)
  round 3.1 hole 2.1: 4(3.556,3.556) 4(3.556,63.556) 4(88.556,3.556) 4(88.556,63.556)
  round 1.2 hole 0.7: 5(79.59,19.425) 6(78.105,16.2) 7(76.62,19.425)

## Via types
v1: diameter 0.7, hole 0.35, Top Signal to Bottom Signal, tented both sides, 25 vias
v2: diameter 1.27, hole 0.711, Top Signal to Bottom Signal, tented both sides, 17 vias
v3: diameter 0.7, hole 0.35, Top Signal to Bottom Signal, 4 vias

## Nets (pads, with @x,y where several pads share a name; then routed paths per layer and width w, separated by ;. In a path a pad name is that pad's centre, name@x,y a point inside that pad or via, vN(x,y) a via of type N, cw(c..) or ccw(c..) an arc to the next point about the centre after c; other vN are vias at no path point)
GND: AREF.2 BOOST.4 C1.2 C2.1 C3.1 C4.1 C6.2 C7.2 C8.2 C9.2 C10.2 C11.2 C12.2 C13.2 C14.1 C15.1 C16.1 DAMP.4 DAMP.7 DRV.11 DRV.13 DRV.14 DRV.17 ENC.4 IAMP.4 LEDA.3 LEDB.2 MCU.25 pad.5 R4.1 R5.1 R13.1 R14.2 SSR.2 SSR.4 SVOB.3 SVOP.3 SVOS.3 SW.2 TRB.2 VAM.1 VAM.2 VAM.6 | length 57.9
  Top Signal w0.254: C2.1@13.383,28.829 C2.1 ; C2.1@13.462,28.956 C2.1@13.745,28.956 ; C3.1@15.367,29.464 C3.1@15.488,29.585 ; DAMP.7@17.157,29.585 DAMP.7 ; C1.2@19.304,41.471 19.489,41.656 VAM.6 ; VAM.6@21.59,41.656 v1(24.13,41.656) 25.4,40.386 VAM.2 ; VAM.1 v1(28.067,39.116) ; SSR.2 v1(29.083,49.784) ; SSR.4 v1(29.083,54.864) ; v1(59.436,52.578) C13.2@60.833,52.578 ; C6.2 C6.2@62.467,25.558 ; v1(62.738,45.212) 63.881,45.212 63.934,45.159 C7.2 ; C10.2 v1(65.024,41.402) ; AREF.2 v1(66.421,53.086) 66.504,53.086 67.393,53.975 C9.2@67.691,53.975 ; DRV.14 DRV.14@65.024,27.871 ; DRV.17@66.97,27.854 v3(67.31,28.194) ; R4.1@73.882,34.925 R4.1 ; v1(74.93,53.34) 74.93,52.507 IAMP.4@75.113,52.324 ; R13.1@80.646,54.992 85.977,54.992 TRB.2
  Top Signal w0.27: v2(16.256,32.258) C11.2 ; DAMP.4@21.971,31.022 C12.2 ; C12.2@21.976,32.275 v2@22.97,32.275
  Top Signal w0.3: DAMP.4 21.896,30.947 DAMP.4@21.971,31.022 ; C4.1 63.383,30.353 63.932,29.804 DRV.11 DRV.17@66.97,29.804 ; C6.2@62.467,25.558 62.592,25.558 63.5,26.466 63.5,27.94 64.008,28.448 65.007,28.448 65.063,28.504 DRV.17@67.62,28.504 ; DRV.14@65.028,27.833 DRV.14 DRV.17@66.97,27.854
  Top Signal w0.34: v2(11.811,28.956) 13.256,28.956 C2.1@13.383,28.829 ; C2.1@13.745,28.956 14.311,29.522 C3.1 ; C3.1@15.488,29.585 DAMP.7@17.157,29.585 ; v2@22.97,32.275 v2(22.987,32.258)
  Top Signal w0.4: v1(72.771,34.925) 72.787,34.941 73.866,34.941 R4.1@73.882,34.925 ; R5.1@74.93,24.892 74.946,24.876 76.057,24.876 v1(76.073,24.892)
  Top Signal w1.17: v2(61.087,8.509) C14.1 ; v2(61.214,15.494) 61.233,15.475 62.831,15.475 R14.2
  other v2: 74.041,7.874 75.819,7.874 74.041,9.525 75.819,9.525
  other v3: 68.58,28.194 67.31,29.464 68.58,29.464
NetAREF_1: AREF.1 C9.1 IAMP.5 | length 4.7
  Top Signal w0.254: AREF.1 67.503,52.136 C9.1@67.691,52.324 ; C9.1@67.691,52.451 67.818,52.324 IAMP.5
NetAREF_3: AREF.3 AREF.4 BOOST.6 C2.2 C3.2 C4.2 C6.1 C13.1 C15.2 C16.2 DAMP.1 DAMP.6 DRV.12 LEDA.1 pad.7 R15.1 SVOB.1 SVOP.1 SVOS.1 | length 27.5
  Top Signal w0.254: C2.2@13.414,30.48 C2.2 C2.2@13.568,30.422 ; C3.2@15.367,30.48 C3.2@15.488,30.359 ; DAMP.6@17.157,30.359 DAMP.6 ; DAMP.1 21.663,28.977 22.839,28.977 v1(22.86,28.956) ; C13.1 60.96,53.975 AREF.4@62.484,53.975 ; AREF.4 AREF.3@64.963,54.036 ; AREF.3 65.004,57.043 68.087,60.126 68.087,60.133 68.657,60.703 SVOP.1@68.66,60.703
  Top Signal w0.3: C6.1@62.23,27.305 C6.1 ; C4.2 63.491,28.713 63.933,29.154 DRV.12
  Top Signal w0.34: v2(11.811,30.607) 13.287,30.607 C2.2@13.414,30.48 ; C2.2@13.568,30.422 C3.2 ; C3.2@15.488,30.359 DAMP.6@17.157,30.359
  Top Signal w0.4: v2(60.706,27.178) 62.103,27.178 C6.1@62.23,27.305 ; C6.1@62.357,27.241 C4.2 ; R15.1@64.899,15.441 R15.1 ; C15.2@71.882,11.176 73.152,11.176 73.66,11.684
  other v2: 75.184,12.573 67.945,14.859 70.358,14.859 72.771,14.859
NetAREF_5: AREF.5 C7.1 C8.1 IAMP.7 | length 13.1
  Top Signal w0.254: AREF.5@62.484,52.197 62.768,52.197 63.002,51.963 63.002,51.507 66.45,48.059 C7.1 65.902,47.286 64.74,47.286 64.19,46.736 C8.1@64.008,46.736 ; C7.1@66.675,48.006 66.847,48.006 67.673,48.832 67.673,49.004 68.453,49.784 IAMP.7
NetAUXM_1: AUXM.1 DRV.2 | length 25.9
  Top Signal w0.4: DRV.2 72.237,27.204 73.025,26.416 73.025,24.257 74.168,23.114 85.852,23.114 87.884,25.146 87.884,27.392 AUXM.1
NetAUXM_2: AUXM.2 DRV.4 | length 15.6
  Top Signal w0.4: DRV.4 75.89,28.504 77.47,26.924 AUXM.2
NetBOOST_1: BOOST.1 R14.1 R15.2 | length 0.1
  Top Signal w0.254: R14.1@62.865,11.938 R14.1@62.918,11.991
NetBOOST_2: BOOST.2 C1.1 DRV.1 ENC.1 MCU.27 R6.1 R7.1 R10.2 R11.2 R12.2 VAM.5 | length 185.2
  Top Signal w0.254: C1.1@19.304,43.111 19.489,42.926 VAM.5 ; VAM.5@21.463,42.926 21.855,42.926 24.31,45.381 R7.1 ; R6.1@31.369,46.736 31.252,46.736 30.734,46.218 R7.1 ; v1(45.466,22.987) 45.466,21.463 MCU.27 ; v1(45.466,38.989) 39.045,45.41 30.763,45.41 R7.1 ; BOOST.2@65.532,9.906 60.071,9.906 58.801,11.176 MCU.27 ; DRV.1@70.866,26.67 68.834,26.67 ; R12.2@79.057,48.438 79.057,48.403 79.057,48.323 79.137,48.244 R12.2 ; R12.2@79.121,48.133 78.789,47.801 78.789,47.547 69.723,38.481 69.723,27.559 68.834,26.67 ; R12.2@79.121,48.438 R10.2 ; R11.2 79.121,57.431 79.883,56.669 v1(79.883,56.642) ; R12.2@79.137,48.403 79.182,48.403 79.485,48.706 R12.2@79.485,48.751 ; MCU.27 58.801,14.224 58.801,16.637 68.834,26.67
  Bottom Signal w0.254: ENC.1@8.157,6.633 12.7,11.176 MCU.27 ; v1(45.466,22.987) v1(45.466,38.989) ; v1(79.121,52.451) 79.883,53.213 v1(79.883,56.642)
NetBOOST_3: BOOST.3 C14.2 L1.2 MCU.1 | length 38
  Top Signal w0.3: MCU.1 MCU.1@35.445,18.796
  Top Signal w0.35: C14.2 64.35,8.509 C14.2@64.516,8.509
  Top Signal w1.17: MCU.1@35.445,18.796 49.034,5.207 L1.2 C14.2@64.262,8.43
NetBOOST_5: BOOST.5 L1.1 | length 5.2
  Top Signal w0.3: 66.548,9.525 66.937,9.914 BOOST.5
  Top Signal w0.7: L1.1@66.548,5.207 66.548,9.525
NetC5_1: C5.1 MCU.5 | length 9.7
  Top Signal w0.254: C5.1 v1(27.432,30.353)
  Bottom Signal w0.254: v1(27.432,30.353) 28.829,28.956 MCU.5
NetC5_2: C5.2 DAMP.3 | length 2.9
  Top Signal w0.254: DAMP.3 C5.2@24.567,30.297
NetC10_1: C10.1 MCU.22 R9.2 | length 23.7
  Top Signal w0.254: v1(60.96,40.005) 60.96,41.353 C10.1 60.96,41.451 R9.2
  Bottom Signal w0.254: MCU.22 54.229,25.4 54.229,31.877 55.174,32.822 56.444,32.822 60.96,37.338 v1(60.96,40.005)
NetC11_1: C11.1 FB2.2 SPKR.1 | length 14.7
  Top Signal w0.254: SPKR.1@5.969,32.512 SPKR.1@5.969,32.549
  Top Signal w0.27: C11.1 17.272,33.147
  Top Signal w0.3: 17.272,33.147 17.972,33.847
  Top Signal w0.34: SPKR.1@5.969,32.549 7.267,33.847 17.972,33.847 FB2.2
NetC12_1: C12.1 FB1.2 SPKR.2 | length 17
  Top Signal w0.3: FB1.2 20.657,33.764 21.227,33.764 21.95,33.041 21.95,32.893
  Top Signal w0.34: SPKR.2@5.989,35.032 19.389,35.032 20.344,34.077 20.344,33.977 20.474,33.847 FB1.2
NetD1_1: D1.1 DRVM.2 PROP.2 SSR.5 | length 8.8
  Top Signal w0.254: DRVM.2@5.969,46.736 DRVM.2@5.969,46.834
  Top Signal w0.5: DRVM.2@5.969,46.834 6.674,47.539 D1.1 ; v2(16.51,54.864) SSR.5
NetD1_2: D1.2 DRVM.1 SSR.6 SSR.7 | length 19.1
  Top Signal w0.254: SSR.7@17.787,49.784 SSR.7 ; SSR.6@18.415,52.324 SSR.6@18.487,52.252
  Top Signal w0.5: DRVM.1 6.914,43.164 D1.2@12.446,43.164 ; D1.2@12.573,43.139 12.573,44.57 SSR.7@17.787,49.784 ; SSR.7 SSR.6@18.487,52.252
NetDAMP_5: DAMP.5 FB2.1 | length 2.2
  Top Signal w0.34: DAMP.5 17.55,30.947 17.605,31.002 17.605,31.483 FB2.1@18.507,32.385
NetDAMP_8: DAMP.8 FB1.1 | length 5.4
  Top Signal w0.254: DAMP.8 DAMP.8@17.275,29.053
  Top Signal w0.34: DAMP.8@17.275,29.052 17.96,29.052 17.961,29.053 18.258,29.053 20.574,31.369 FB1.1@20.574,32.385
NetDRV_3: DRV.3 R5.2 | length 4.3
  Top Signal w0.3: DRV.3 74.286,27.854 R5.2
NetDRV_5: DRV.5 STRM.2 | length 17.9
  Top Signal w0.4: DRV.5 75.001,29.154 82.042,36.195 STRM.2
NetDRV_6: DRV.6 R4.2 | length 5.3
  Top Signal w0.3: DRV.6 72.984,29.804 73.914,30.734 R4.2
NetDRV_7: DRV.7 STRM.1 | length 19.6
  Top Signal w0.4: DRV.7 72.025,30.454 72.644,31.073 72.644,33.147 73.279,33.782 74.803,33.782 79.716,38.695 STRM.1
NetDRV_9: DRV.9 MCU.21 | length 11.7
  Top Signal w0.254: MCU.21 61.087,31.75 63.246,31.75 63.881,31.115 DRV.9@65.024,31.115
NetDRV_10: DRV.10 MCU.20 | length 17.4
  Top Signal w0.254: MCU.20 56.007,28.956 60.96,33.909 65.913,33.909 66.929,32.893 66.929,31.496 66.9,31.496 65.902,30.498 65.051,30.498 DRV.10
NetDRV_15: DRV.15 MCU.10 | length 39.9
  Top Signal w0.254: MCU.10 35.306,41.783 35.433,41.783 36.703,41.783 53.34,25.146 56.642,25.146 57.912,23.876 62.992,23.876 63.99,24.874 63.99,26.906 64.262,27.178 DRV.15@65.024,27.178
NetDRV_16: DRV.16 MCU.9 | length 39.3
  Top Signal w0.254: MCU.9 35.538,39.011 36.808,39.011 53.213,22.606 63.119,22.606 65.007,24.494 DRV.16
NetENC_2: ENC.2 MCU.24 | length 51.6
  Bottom Signal w0.254: ENC.2@8.128,9.144 11.811,12.827 35.179,12.827 41.148,18.796 MCU.24
NetENC_3: ENC.3 MCU.23 | length 51.7
  Bottom Signal w0.254: ENC.3@8.064,11.747 10.922,14.605 34.036,14.605 40.767,21.336 MCU.23
NetIAMP_1: IAMP.1 R8.1 | length 2.7
  Top Signal w0.254: R8.1 74.881,47.957 74.881,48.42 IAMP.1
NetIAMP_2: IAMP.2 R10.1 R13.2 | length 9.7
  Top Signal w0.254: IAMP.2 75.413,49.784 77.851,52.222 77.851,54.869 78.689,55.707 79.075,55.707 79.13,55.762 80.636,55.762 R13.2
NetIAMP_3: IAMP.3 R11.1 TRB.1 | length 16.8
  Top Signal w0.254: IAMP.3 75.413,51.054 76.835,52.476 76.835,56.642 78.486,58.293 79.121,58.293 81.407,58.293 82.189,57.511 TRB.1
NetIAMP_6: IAMP.6 R9.1 | length 11.9
  Top Signal w0.254: R9.1 v1(60.96,45.466) ; v1(68.072,51.054) IAMP.6
  Bottom Signal w0.254: v1(60.96,45.466) 66.548,51.054 v1(68.072,51.054)
NetIAMP_8: IAMP.8 R8.2 | length 2.6
  Top Signal w0.254: IAMP.8@69.596,48.514 69.596,47.942 R8.2
NetLEDA_2: LEDA.2 MCU.7 | length 33.9
  Top Signal w0.254: LEDA.2@5.969,23.241 23.495,23.241 34.29,34.036 MCU.7
NetLEDB_1: LEDB.1 R12.1 | length 4.9
  Top Signal w0.254: R12.1 81.157,48.113 LEDB.1
NetMCU_2: MCU.2 SW.1 | length 21
  Top Signal w0.254: SW.1@27.685,3.811 31.623,7.75 31.623,17.78 MCU.2@35.433,21.59
NetMCU_4: MCU.4 R3.1 | length 3.4
  Top Signal w0.254: R3.1@32.004,26.416 MCU.4
NetMCU_6: MCU.6 SVOB.2 | length 39
  Bottom Signal w0.254: MCU.6 47.289,43.352 47.289,48.9 SVOB.2
NetMCU_8: MCU.8 R2.1 | length 3.3
  Top Signal w0.254: R2.1@32.131,36.576 MCU.8
NetMCU_11: MCU.11 R7.2 VAM.4 | length 9.1
  Top Signal w0.254: VAM.4@26.924,42.926 27.28,42.926 28.635,44.281 R7.2 ; R7.2@30.725,44.272 30.759,44.238 35.391,44.238 MCU.11
NetMCU_12: MCU.12 R6.2 VAM.3 | length 13.6
  Top Signal w0.254: VAM.3@26.924,41.656 v1(30.353,41.656) ; R6.2@32.483,46.736 MCU.12
  Bottom Signal w0.254: v1(30.353,41.656) MCU.12
NetMCU_13: MCU.13 SVOP.2 | length 21.2
  Bottom Signal w0.254: MCU.13 57.19,46.736 SVOP.2
NetMCU_18: MCU.18 pad.6 | length 39.8
  Bottom Signal w0.254: MCU.18 54.61,34.036 53.086,32.512 53.086,24.511 54.991,22.606 68.961,22.606 75.367,16.2 pad.6
NetMCU_19: MCU.19 SVOS.2 | length 35.7
  Bottom Signal w0.254: MCU.19@55.88,31.496 62.147,31.496 75.863,17.78 SVOS.2@85.852,17.78
NetPROP_1: PROP.1 R1.1 VAM.8 | length 6.9
  Top Signal w0.254: R1.1@16.264,39.428 R1.1
  Top Signal w0.5: v2(15.113,39.116) 15.144,39.085 16.606,39.085 R1.1 ; R1.1@16.637,39.116 VAM.8
NetR1_2: R1.2 SSR.8 VAM.7 | length 12.5
  Top Signal w0.254: SSR.8@17.787,47.244 SSR.8
  Top Signal w0.5: SSR.8@17.787,47.244 16.51,45.967 16.51,41.307 17.431,40.386 VAM.7
NetR2_2: R2.2 SSR.1 | length 12.4
  Top Signal w0.254: SSR.1@27.559,47.244 28.187,47.244 29.33,46.101 v1(29.337,46.101) ; v1(29.337,38.1) 29.337,38.087 30.823,36.601 R2.2
  Bottom Signal w0.254: v1(29.337,38.1) v1@29.337,46.083
NetR3_2: R3.2 SSR.3 | length 30.7
  Top Signal w0.254: v1(25.527,51.054) 25.527,51.064 26.787,52.324 SSR.3@27.686,52.324 ; v1(28.829,26.416) R3.2
  Bottom Signal w0.254: v1(25.527,51.054) 25.527,29.718 v1(28.829,26.416)
pads on no net: DAMP.2 DRV.8 MCU.3 MCU.14 MCU.15 MCU.16 MCU.17 MCU.26 MCU.28

## Polygon pours and split planes (outlines as drawn)
NetBOOST_3 on Top Signal "NONET_L02_P-001" (solid, pour order 3): 65.786,9.525 63.627,9.525 63.627,7.747 65.278,7.747 65.786,8.255
GND on Top Signal "NONET_L02_P-001" (solid, pour order 4): 67.056,9.525 67.056,7.874 69.215,5.715 76.835,5.715 76.835,10.922 73.787,10.922 72.39,9.525 71.374,9.525
NetAREF_3 on Top Signal "NONET_L02_P-001" (solid, pour order 2): 73.279,16.129 76.835,12.573 76.835,11.43 73.787,11.43 72.771,10.414 72.771,10.287 67.056,10.287 67.056,13.589 65.786,14.859 64.262,14.859 64.262,16.129 67.945,16.129
NetBOOST_1 on Top Signal "NONET_L02_P-001" (solid, pour order 1): 65.913,10.287 65.913,12.7 62.103,12.7 62.103,10.287
NetD1_1 on GND Plane (split plane): 3.556,66.602 22.658,66.602 22.658,45.847 22.658,38.057 21.76,37.159 15.324,37.159 12.462,40.021 12.42,40.053 12.371,40.073 12.319,40.08 0.51,40.08 0.51,63.556 0.509,63.572 0.518,63.795 0.546,64.033 0.592,64.267 0.657,64.498 0.74,64.722 0.84,64.94 0.957,65.148 1.09,65.347 1.238,65.535 1.401,65.711 1.577,65.874 1.765,66.022 1.964,66.155 2.172,66.272 2.39,66.372 2.614,66.455 2.844,66.52 3.079,66.566 3.317,66.594 3.54,66.603
GND on GND Plane (split plane): 88.795,66.594 89.033,66.566 89.267,66.52 89.498,66.455 89.722,66.372 89.94,66.272 90.148,66.155 90.347,66.022 90.535,65.874 90.711,65.711 90.874,65.535 91.022,65.347 91.155,65.148 91.272,64.94 91.372,64.722 91.455,64.498 91.52,64.267 91.566,64.033 91.594,63.795 91.603,63.572 91.602,63.556 91.602,3.556 91.603,3.54 91.594,3.317 91.566,3.079 91.52,2.845 91.455,2.614 91.372,2.39 91.272,2.172 91.155,1.964 91.022,1.765 90.874,1.577 90.711,1.401 90.535,1.238 90.347,1.09 90.148,0.957 89.94,0.84 89.722,0.74 89.498,0.657 89.267,0.592 89.033,0.546 88.795,0.518 88.572,0.509 88.556,0.51 3.556,0.51 3.54,0.509 3.317,0.518 3.079,0.546 2.845,0.592 2.614,0.657 2.39,0.74 2.172,0.84 1.964,0.957 1.765,1.09 1.577,1.238 1.401,1.401 1.238,1.577 1.09,1.765 0.957,1.964 0.84,2.172 0.74,2.39 0.657,2.614 0.592,2.845 0.546,3.079 0.518,3.317 0.509,3.54 0.51,3.556 0.51,39.676 12.235,39.676 15.097,36.814 15.139,36.782 15.153,36.776 15.188,36.762 15.24,36.755 21.844,36.755 21.896,36.762 21.945,36.782 21.987,36.814 23.003,37.83 23.035,37.872 23.055,37.921 23.062,37.973 23.062,45.847 23.062,66.602 88.556,66.602 88.572,66.603
NetPROP_1 on PWR Plane (split plane): 3.556,66.602 22.658,66.602 22.658,38.057 21.76,37.159 15.324,37.159 12.462,40.021 12.42,40.053 12.371,40.073 12.319,40.08 0.51,40.08 0.51,63.556 0.509,63.572 0.518,63.795 0.546,64.033 0.592,64.267 0.657,64.498 0.74,64.722 0.84,64.94 0.957,65.148 1.09,65.347 1.238,65.535 1.401,65.711 1.577,65.874 1.765,66.022 1.964,66.155 2.172,66.272 2.39,66.372 2.614,66.455 2.844,66.52 3.079,66.566 3.317,66.594 3.54,66.603
NetAREF_3 on PWR Plane (split plane): 88.795,66.594 89.033,66.566 89.267,66.52 89.498,66.455 89.722,66.372 89.94,66.272 90.148,66.155 90.347,66.022 90.535,65.874 90.711,65.711 90.874,65.535 91.022,65.347 91.155,65.148 91.272,64.94 91.372,64.722 91.455,64.498 91.52,64.267 91.566,64.033 91.594,63.795 91.603,63.572 91.602,63.556 91.602,3.556 91.603,3.54 91.594,3.317 91.566,3.079 91.52,2.845 91.455,2.614 91.372,2.39 91.272,2.172 91.155,1.964 91.022,1.765 90.874,1.577 90.711,1.401 90.535,1.238 90.347,1.09 90.148,0.957 89.94,0.84 89.722,0.74 89.498,0.657 89.267,0.592 89.033,0.546 88.795,0.518 88.572,0.509 88.556,0.51 3.556,0.51 3.54,0.509 3.317,0.518 3.079,0.546 2.845,0.592 2.614,0.657 2.39,0.74 2.172,0.84 1.964,0.957 1.765,1.09 1.577,1.238 1.401,1.401 1.238,1.577 1.09,1.765 0.957,1.964 0.84,2.172 0.74,2.39 0.657,2.614 0.592,2.845 0.546,3.079 0.518,3.317 0.509,3.54 0.51,3.556 0.51,39.676 12.235,39.676 15.097,36.814 15.139,36.782 15.153,36.776 15.188,36.762 15.24,36.755 21.844,36.755 21.896,36.762 21.945,36.782 21.987,36.814 23.003,37.83 23.035,37.872 23.055,37.921 23.062,37.973 23.062,66.602 88.556,66.602 88.572,66.603

## Other copper
GND Plane (plane layer: these items are gaps in the copper):
  lines w0.254: 22.733,67.056 22.86,66.929
  lines w0.4: 0,39.878 12.319,39.878 15.24,36.957 21.844,36.957 22.86,37.973 22.86,45.847 22.86,66.929
PWR Plane (plane layer: these items are gaps in the copper):
  lines w0.4: 0,39.878 12.319,39.878 15.24,36.957 21.844,36.957 22.86,37.973 22.86,67.056

## Silkscreen, mask and mechanical layers (free items; w line width, h text height)
Top Overlay:
  drawing of 78 lines, arcs and shapes, not listed
  text "McMaster Chem-E Car 25-26 / MAC to the Future V.88" at 13.97,59.817 h1.52
  text "1.21 GW" at 11.715,52.166 h1.32 r90
  text "+" at 64.739,48.951 h1
  text "-" at 10.383,48.745 h1
  text "-" at 65.12,43.284 h1
  text "+" at 10.383,40.569 h1
  text "Designers: SS, EG, / AA, TN, CC, / VU, SR, YV" at 38.989,3.175 h1.2
  text "142 KPH" at 11.526,2.001 h1.32
  text "1955-11-05" at 72.105,2.001 h1.32
Bottom Overlay:
  text "WayWayWay" at 85.09,64.341 h1
Mechanical 13:
  the board outline again, w0.254